# Altium PCB LIS2HH12TR.pcbdoc
Units mil, origin at the board's own origin, x right, y up, seen from the top; angles counter-clockwise.
Board outline 600 x 605.3 mil, 2 copper layers (Top Layer, Bottom Layer), stack 0 mil thick; 1 components, 0 nets, 12 pads, 0 vias.
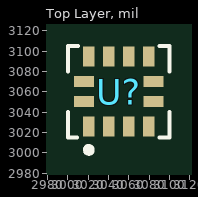
[diagram p0: Top Layer view]
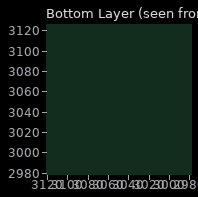
[diagram p1: Bottom Layer view, seen from below]

## Layer stack, top to bottom
Top Layer: signal copper (thickness not stored)
Bottom Layer: signal copper (thickness not stored)

## Board outline
3350,2750 2750,2750 2750,3355.3 3350,3355.3

## Components (designator, comment, footprint, x,y, rotation, side; value= is the part's Value field where it differs from the comment)
U? "LIS2HH12TR" LGA-12_L2.0-W2.0-P0.50-BL 3050,3060.3 r0 top

## Footprints (in the part's own frame and the unit in brackets; to place one, negate y for a bottom-side part, rotate by r counter-clockwise, add the part's x,y. Pads: shape width x height; smd on the part's side, far side on the other; paste and mask are expansions set on the pad)
LGA-12_L2.0-W2.0-P0.50-BL [mil]
  rect 11x19.7 smd: 1(-29.5,-34.4) 2(-9.8,-34.4) 3(9.8,-34.4) 4(29.5,-34.4) 7(29.5,34.5) 8(9.8,34.5) 9(-9.8,34.5) 10(-29.5,34.5)
  rect 19.7x11 smd: 5(34.4,-9.8) 6(34.4,9.9) 11(-34.4,9.9) 12(-34.4,-9.8)
  silkscreen extent -50,-60 50,45

## Nets (pads, with @x,y where several pads share a name; then routed paths per layer and width w, separated by ;. In a path a pad name is that pad's centre, name@x,y a point inside that pad or via, vN(x,y) a via of type N, cw(c..) or ccw(c..) an arc to the next point about the centre after c; other vN are vias at no path point)
pads on no net: U?.1 U?.2 U?.3 U?.4 U?.5 U?.6 U?.7 U?.8 U?.9 U?.10 U?.11 U?.12